# Altium PCB RF-IR-Blaster-v1.0.PcbDoc (part 1 of 2)
Units mm, origin at the board's own origin, x right, y up, seen from the top; angles counter-clockwise.
Board outline 65 x 61 mm, 2 copper layers (Top Layer, Bottom Layer), stack 1.58 mm thick; 64 components, 33 nets, 844 pads, 139 vias.
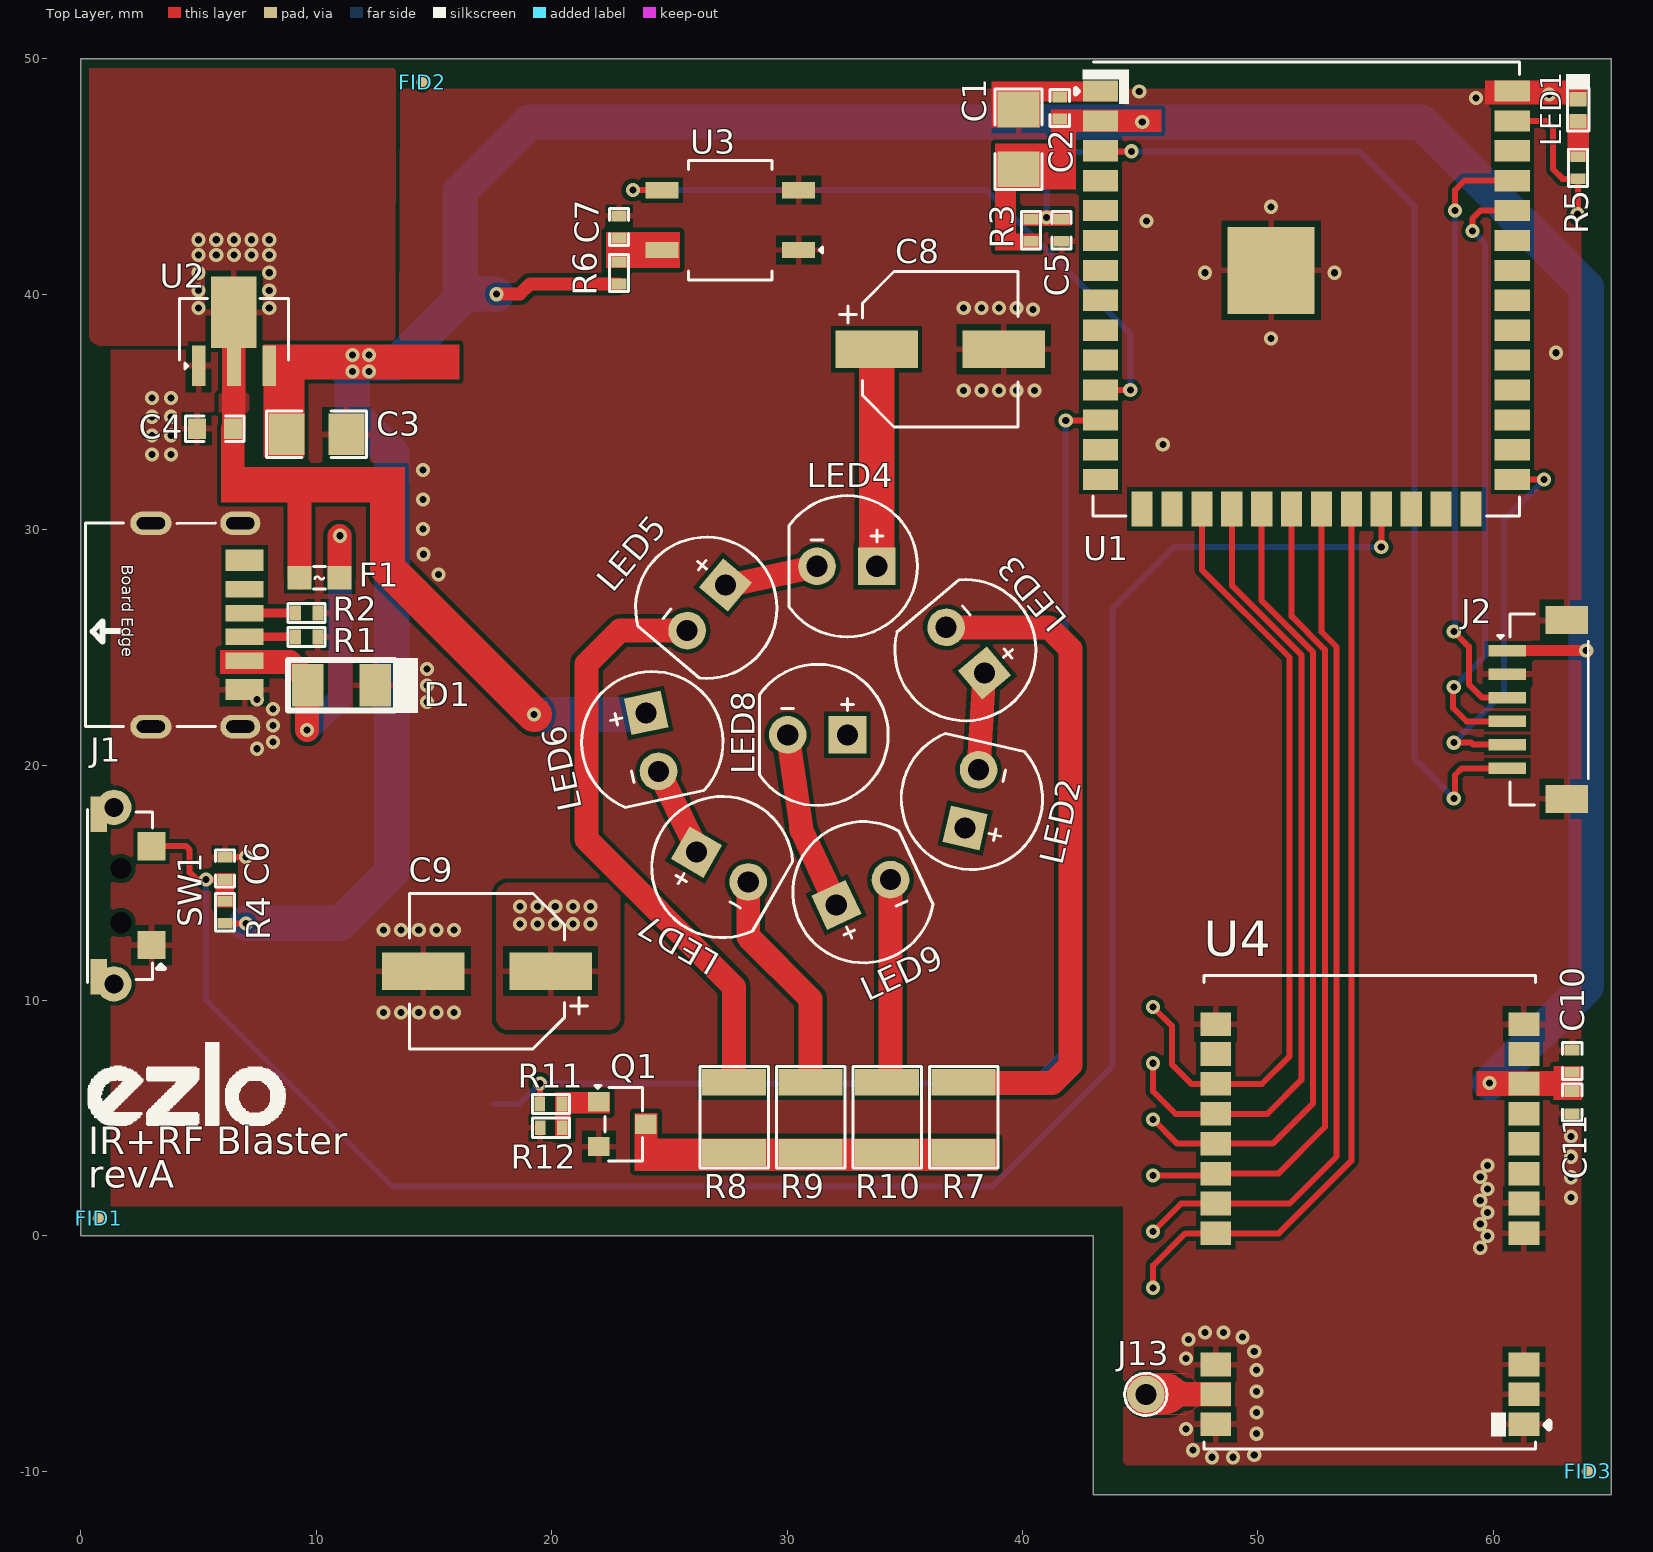
[diagram p0: Top Layer view]
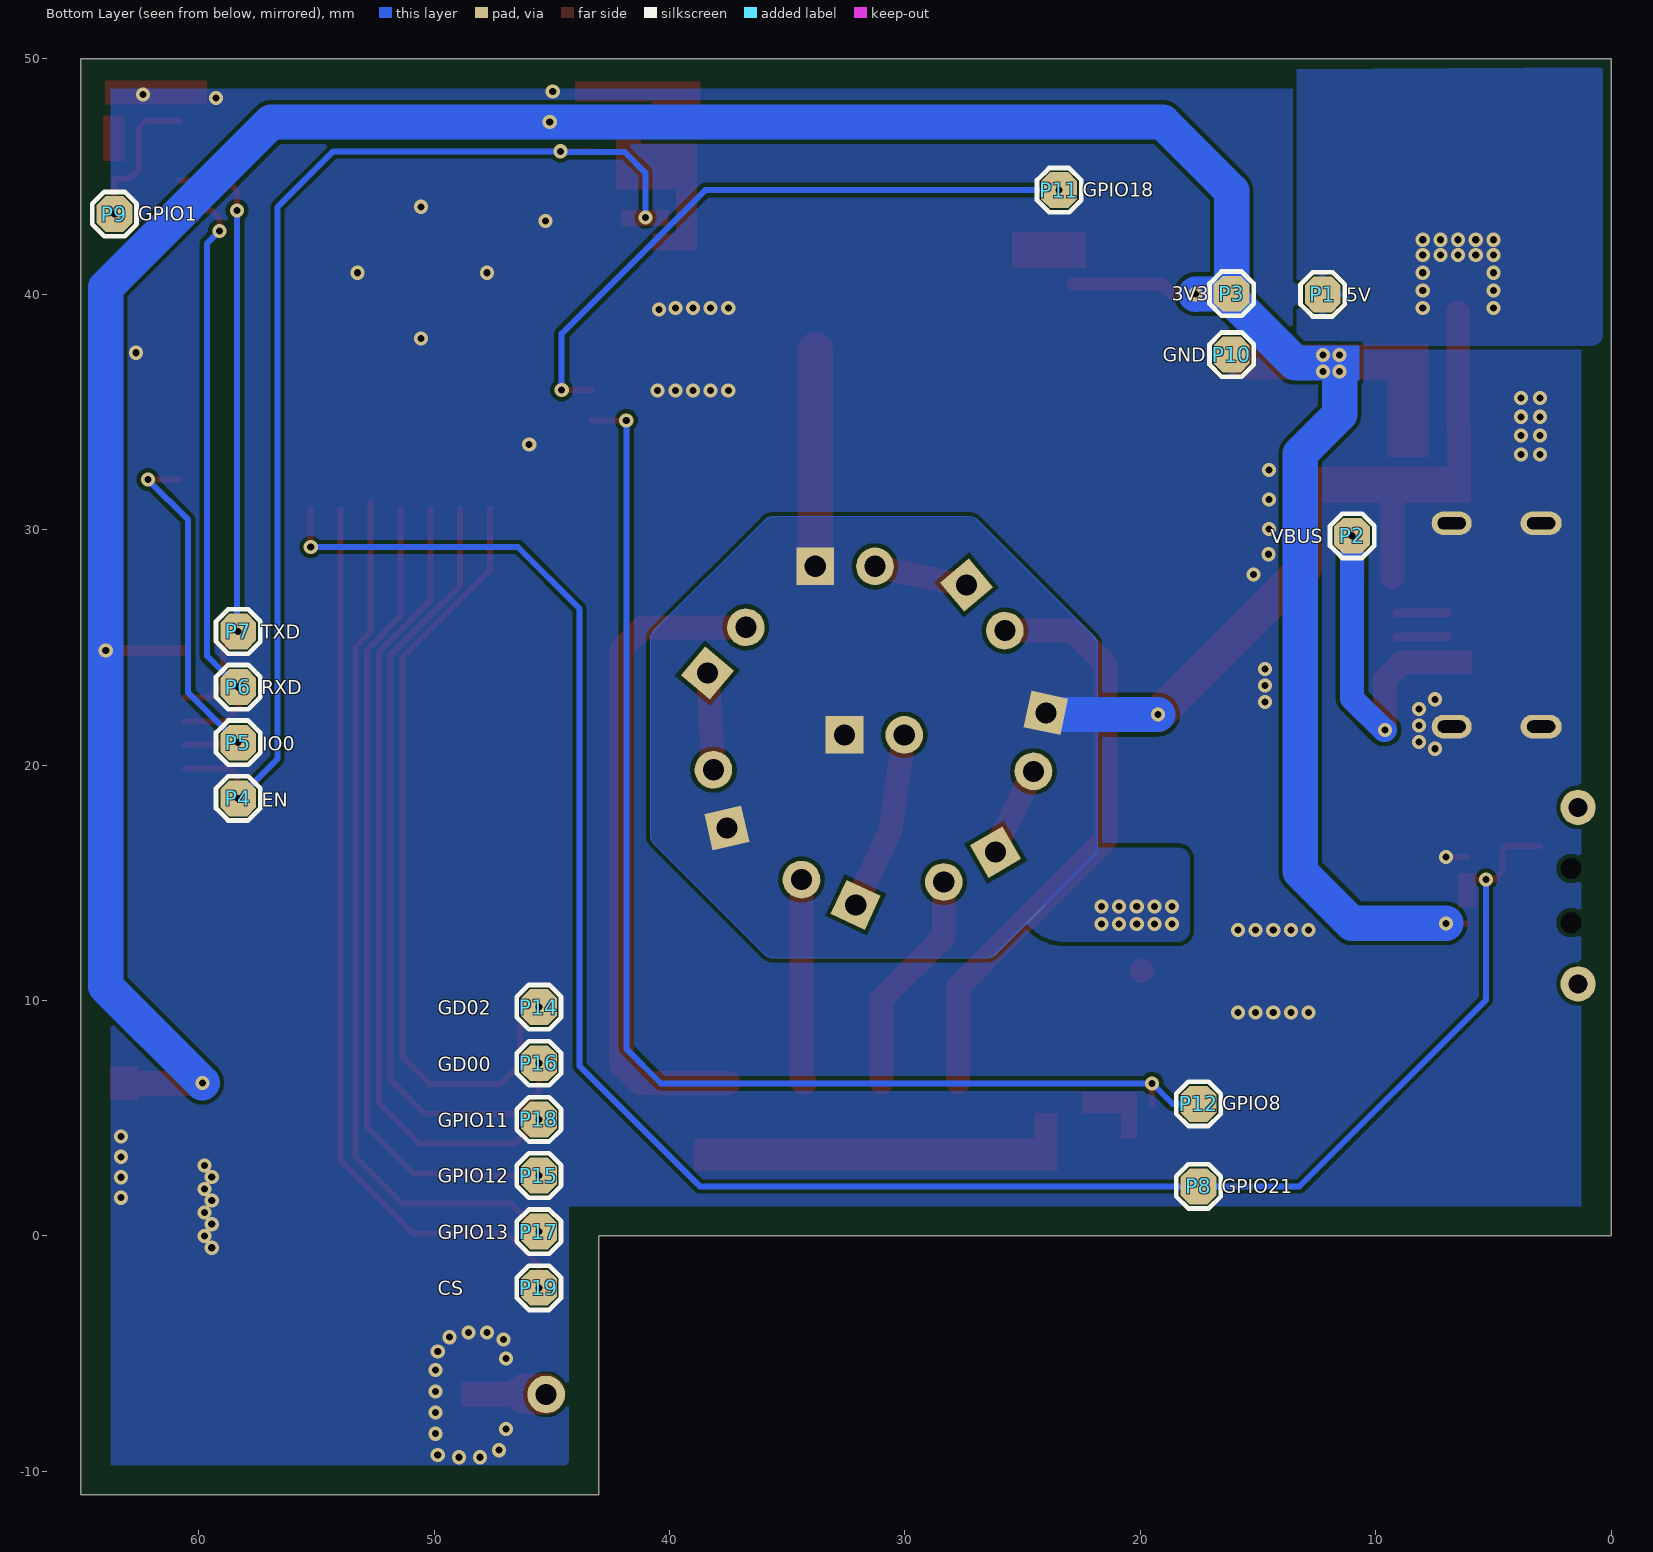
[diagram p1: Bottom Layer view, seen from below]

## Layer stack, top to bottom
Top Solder: solder mask 0.01, Solder Resist, Dk 3.3
Top Layer: signal copper 0.035
Dielectric 1: dielectric 1.51, FR-4, Dk 4.5
Bottom Layer: signal copper 0.035
Bottom Solder: solder mask 0.01, Solder Resist, Dk 3.3

## Board outline
0,0 0,50 65,50 65,-11 43,-11 43,0

## Design rules (kind name [scope] priority, off if disabled: settings)
Clearance [All] p1: gap=0.178 ignorepadtopadclearanceinfootprint=FALSE except(0: Arc-Hole Track-Hole SMDPad-Hole THPad-Hole Via-Hole Fill-Hole Poly-Hole Region-Hole Text-Hole; 0.102: Arc-SMDPad Track-SMDPad SMDPad-SMDPad)
HoleSize [All] p1: absolutevalues=TRUE maxlimit=25.4 minlimit=0.025 maxpercent=80.000 minpercent=20.000
HoleToHoleClearance [All] p1: gap=0 allowstackedmicrovias=TRUE
MinimumSolderMaskSliver [All] p1: minsoldermaskwidth=0
PolygonConnect [All] p1: thpad.connectstyle=Direct thpad.reliefconductorwidth=0.254 thpad.reliefentries=4 thpad.polygonreliefangle="90 Angle" thpad.airgapwidth=0.254 smdpad.connectstyle=Relief smdpad.reliefconductorwidth=0.254 smdpad.reliefentries=4 smdpad.polygonreliefangle="90 Angle" smdpad.airgapwidth=0.254 via.connectstyle=Direct via.reliefconductorwidth=0.254 via.reliefentries=4 via.polygonreliefangle="90 Angle" via.airgapwidth=0.254
RoutingVias [All] p1: holewidth=0.3 width=0.6 viastyle="Through Hole" minholewidth=0.3 minwidth=0.6 maxholewidth=0.3 maxwidth=0.6
SilkToSilkClearance [All] p1: silktosilkclearance=0
SilkToSolderMaskClearance [IsPad] p1: minsilkscreentomaskgap=0 clearancetoexposedcopper=TRUE
SolderMaskExpansion [All] p1: expansion=0.102 istentingtop=FALSE
Width [All] p1: maxlimit=1.5 minlimit=0.254 preferedwidth=0.559
25 further rules are at their usual default settings.

## Classes and differential pairs
component class U_USB-Power-Sheet: C3 C4 D1 F1 J1 P1 P2 P3 P10 R1 R2 U2
component class U_IR-Transmitter-Sheet: C8 C9 LED2 LED3 LED4 LED5 LED6 LED7 LED8 LED9 P12 Q1 R7 R8 R9 R10 R11 R12
component class U_IR-Reciever-Sheet: C7 P11 R6 U3
component class U_Controller-Sheet: C1 C2 C5 C6 J2 LED1 P4 P5 P6 P7 P8 P9 R3 R4 R5 SW1 U1
component class U_CC1101-Sheet: C10 C11 J13 P14 P15 P16 P17 P18 P19 U4

## Components (designator, comment, footprint, x,y, rotation, side; value= is the part's Value field where it differs from the comment)
C1 "22uF" Cap-1206 39.827,46.584 r270 top locked
C2 "100nF" Cap-0402 41.58,47.917 r270 top
C3 "22uF" Cap-1206 10.008,34.058 r180 top locked
C4 "10uF" CAP-0603 5.69,34.29 r0 top locked
C5 "1uF" Cap-0402 41.656,42.721 r90 top locked
C6 "100nF" Cap-0402 6.122,15.617 r270 top locked
C7 "4.7uF" Cap-0402 22.86,42.861 r270 top locked
C8 "220uF" RT1A221M0605 36.5,37.666 r0 top locked
C9 "220uF" RT1A221M0605 17.25,11.25 r180 top locked
C10 "1uF" Cap-0402 63.348,7.428 r270 top locked
C11 "100nF" Cap-0402 63.348,5.662 r90 top locked
D1 "SMF5.0CA" SOD-123FL 11.067,23.392 r180 top locked
F1 "BSMD0603L-100" fuse-0603 10.135,27.962 r180 top locked
FID1 "Fiducial" Fiducial_0.5mm_Mask1mm 0.75,0.75 r0 top
FID2 "Fiducial" Fiducial_0.5mm_Mask1mm 14.5,49 r0 top
FID3 "Fiducial" Fiducial_0.5mm_Mask1mm 64,-10 r0 top
J1 "TYPE-C-31-M-17" TYPE-C-31-M-17_ 4.962,25.957 r270 top locked
J2 "Voltlink Target" "Voltlink Target" 61.857,22.364 r270 top locked
J13 "Test Point TH 0.9mm" "TP 0.9mm" 45.237,-6.731 r0 top
LED1 "XZVG68W-2" LED-0402 63.602,47.819 r90 top locked
LED2 "IR333-A" IR333_A 37.846,18.566 r77 top locked
LED3 "IR333-A" IR333_A 37.57,24.883 r130 top locked
LED4 "IR333-A" IR333_A 32.538,28.446 r180 top locked
LED5 "IR333-A" IR333_A 26.565,26.686 r230 top locked
LED6 "IR333-A" IR333_A 24.273,20.976 r282 top locked
LED7 "IR333-A" IR333_A 27.247,15.67 r330 top locked
LED8 "IR333-A" IR333_A 31.293,21.285 r180 top
LED9 "IR333-A" IR333_A 33.241,14.602 r25 top locked
P1 "TEST POINT" Test-point 12.25,40 r180 bottom locked
P2 "TEST POINT" Test-point 10.998,29.743 r180 bottom locked
P3 "TEST POINT" Test-point 16.118,40.025 r180 bottom locked
P4 "TEST POINT" Test-point 58.319,18.591 r180 bottom locked
P5 "TEST POINT" Test-point 58.319,20.953 r180 bottom locked
P6 "TEST POINT" Test-point 58.319,23.315 r180 bottom locked
P7 "TEST POINT" Test-point 58.319,25.678 r180 bottom locked
P8 "TEST POINT" Test-point 17.526,2.108 r180 bottom
P9 "TEST POINT" Test-point 63.576,43.409 r270 bottom
P10 "TEST POINT" Test-point 16.118,37.44 r180 bottom locked
P11 "TEST POINT" Test-point 23.444,44.425 r180 bottom
P12 "TEST POINT" Test-point 17.526,5.613 r180 bottom
P14 "TEST POINT" Test-point 45.542,9.722 r90 bottom
P15 "TEST POINT" Test-point 45.542,2.568 r90 bottom
P16 "TEST POINT" Test-point 45.542,7.338 r90 bottom
P17 "TEST POINT" Test-point 45.542,0.184 r90 bottom
P18 "TEST POINT" Test-point 45.542,4.953 r90 bottom
P19 "TEST POINT" Test-point 45.542,-2.201 r90 bottom
Q1 "YJL2302B" SOT-23-3L_ 23,4.75 r270 top locked
R1 "5.1K" Res-0402 9.588,25.451 r180 top locked
R2 "5.1K" Res-0402 9.588,26.467 r180 top locked
R3 "10K" Res-0402 40.361,42.721 r270 top locked
R4 "10K" Res-0402 6.122,13.75 r270 top locked
R5 "1K" Res-0402 63.602,45.375 r270 top locked
R6 "100R" Res-0402 22.86,40.905 r270 top locked
R7 "14R" Res_1210 37.5,5.038 r270 top
R8 "14R" Res_1210 27.75,5.038 r270 top
R9 "14R" Res_1210 31,5.038 r270 top
R10 "14R" Res_1210 34.25,5.038 r270 top
R11 "100R" Res-0402 19.964,5.613 r180 top locked
R12 "10K" Res-0402 19.977,4.597 r0 top locked
SW1 "YTS-B003-2A" YTS-B003-2A 1.877,14.458 r90 top locked
U1 "ESP32-S3-WROOM-1U-N4" "41-SMD UFL Module" 52.057,39.757 r0 top locked
U2 "LR1107G-33-AB3-C-R" SOT-89-3 6.5,38.1 r0 top locked
U3 "IRM-H638T/TR2" SMD-4,4x5mm 27.585,43.153 r180 top locked
U4 "E07-400M10S" E07-400M10S 54.75,0.5 r180 top locked

## Footprints (in the part's own frame and the unit in brackets; to place one, negate y for a bottom-side part, rotate by r counter-clockwise, add the part's x,y. Pads: shape width x height; smd on the part's side, far side on the other; paste and mask are expansions set on the pad)
"41-SMD UFL Module" [mm]
  rect 1.5x0.9 smd: 1(-8.75,8.88) 2(-8.75,7.61) 3(-8.75,6.34) 4(-8.75,5.07) 5(-8.75,3.8) 6(-8.75,2.53) 7(-8.75,1.26) 8(-8.75,-0.01) 9(-8.75,-1.28) 10(-8.75,-2.55) 11(-8.75,-3.82) 12(-8.75,-5.09) 13(-8.75,-6.36) 14(-8.75,-7.63) 27(8.75,-7.63) 28(8.75,-6.36) 29(8.75,-5.09) 30(8.75,-3.82) 31(8.75,-2.55) 32(8.75,-1.28) 33(8.75,-0.01) 34(8.75,1.26) 35(8.75,2.53) 36(8.75,3.8) 37(8.75,5.07) 38(8.75,6.34) 39(8.75,7.61) 40(8.75,8.88)
  rect 0.9x1.5 smd: 15(-6.98,-8.88) 16(-5.71,-8.88) 17(-4.44,-8.88) 18(-3.17,-8.88) 19(-1.9,-8.88) 20(-0.63,-8.88) 21(0.64,-8.88) 22(1.91,-8.88) 23(3.18,-8.88) 24(4.45,-8.88) 25(5.72,-8.88) 26(6.99,-8.88)
  rect 3.7x3.7 smd: 41(-1.5,1.26)
  silkscreen extent -9.8,-9.17 9.05,10.11, body extent -9,-9.12 10.99,123, height 7.73
Cap-0402 [mil]
  rect 18x25 smd mask+2.36: 1(-18.5,0) 2(18.5,0)
  silkscreen extent -31,-16 31,16, body extent -20,-10 20,10, height 19
CAP-0603 [mil]
  rect 30x35 smd mask+2.36: 1(-30,0) 2(30,0)
  silkscreen extent -49,-21 49,21, body extent -32,-16 31,16, height 34
Cap-1206 [mil] "SMD 1206"
  rect 60x70 smd: 1(-50,0) 2(50,0)
  silkscreen extent -84,-39 84,39, body extent -63,-31 63,32, height 39
E07-400M10S [mm]
  rect 1.3x1 smd: 1(-6.55,8.5) 2(-6.55,7.23) 3(-6.55,5.96) 4(-6.55,0.39) 5(-6.55,-0.88) 6(-6.55,-2.15) 7(-6.55,-3.42) 8(-6.55,-4.69) 9(-6.55,-5.96) 10(-6.55,-7.23) 11(-6.55,-8.5) 12(6.55,-8.5) 13(6.55,-7.23) 14(6.55,-5.96) 15(6.55,-4.69) 16(6.55,-3.42) 17(6.55,-2.15) 18(6.55,-0.88) 19(6.55,0.39) 20(6.55,5.96) 21(6.55,7.23) 22(6.55,8.5)
  silkscreen extent -7.62,-10.57 7.04,9.55, body extent -7,-10.51 7,9.49, height 3.1
Fiducial_0.5mm_Mask1mm [mm]
  round 0.5 smd paste-0.5 mask+0.25: Un1(0,0)
fuse-0603 [mm]
  rect 1x1 smd: 1(-0.85,0) 2(0.85,0)
  silkscreen extent -0.25,-0.48 0.25,0.48, body extent -0.77,-0.42 0.78,0.43, height 0.45
IR333_A [mm]
  rect 1.6x1.6 hole 0.9: 1(-1.27,0)
  round 1.6 hole 0.9: 2(1.27,0)
  silkscreen extent -3,-3 2.47,3, body extent -2.95,-10.72 2.45,0.23, height 7.95
LED-0402 [mm]
  rect 0.62x0.72 smd: 1(-0.475,0) 2(0.475,0)
  silkscreen extent -0.89,-0.51 1.55,0.51, body extent -0.5,-0.25 0.51,0.25, height 0.45
Res-0402 [mil]
  rect 18x25 smd mask+2.17: 1(-18.5,0) 2(18.5,0)
  silkscreen extent -32,-17 32,16, body extent -23,-11 23,11, height 16
Res_1210 [mm]
  rect 1.14x2.72 smd: 1(-1.49,0) 2(1.49,0)
  silkscreen extent -2.16,-1.45 2.16,1.45, body extent -1.6,-1.25 1.6,1.25, height 0.7
RT1A221M0605 [mm]
  rect 3.5x1.6 smd: 1(-2.7,0) 2(2.7,0)
  silkscreen extent -4.27,-3.3 3.3,3.3, body extent -3.61,-3.33 3.59,3.27, height 5.4
SMD-4,4x5mm [mm]
  rect 1.4x0.7 smd: 1(-2.9,1.27) 2(-2.9,-1.27) 3(2.9,-1.27) 4(2.9,1.27)
  silkscreen extent -3.91,-2.54 1.78,2.54, body extent -3.5,-2.5 3.5,2.5, height 3.99
SOD-123FL [mm]
  rect 1.34x1.8 smd: 1(-1.43,0) 2(1.43,0)
  silkscreen extent -3.25,-1.17 2.26,1.17, body extent -1.8,-0.82 1.8,0.82, height 0.95
SOT-23-3L_ [mm]
  rect 0.82x0.92 smd: 1(-0.95,-1) 2(0.95,-1) 3(0,1)
  silkscreen extent -1.65,-1.17 1.56,0.86, body extent -1.5,-1.25 1.5,1.25, height 1.1
SOT-89-3 [mm]
  rect 0.58x1.73 smd: 1(-1.5,-1.132) 2(0,-1.132) 3(1.5,-1.132)
  rect 1.933x3.03 smd: 2(0,1.132)
  silkscreen extent -2.31,-1.27 2.31,1.73, body extent -2.25,-1.84 2.25,2.41, height 1.54
Test-point [mil]
  oct 60x60 smd: 1(0,0)
  silkscreen extent -37,-37 37,37
"TP 0.9mm" [mm]
  round 1.6 hole 0.9: 1(0,0)
  silkscreen extent -0.9,-0.9 0.9,0.9
TYPE-C-31-M-17_ [mm]
  rect 0.7x1.6 smd: A5(-0.5,1.99) A9(1.52,1.99) B5(0.5,1.99) B9(-1.52,1.99)
  rect 0.9x1.6 smd: A12(2.75,1.99) B12(-2.75,1.99)
  oval 1x1.7 hole 0.52 slot 1.2 at 90 deg: MH1(4.32,1.81) MH4(-4.32,1.81)
  oval 1x1.75 hole 0.52 slot 1.2 at 90 deg: MH2(4.32,-1.99) MH3(-4.32,-1.99)
  silkscreen extent -4.32,-4.78 4.32,0.75, body extent -4.47,-4.72 4.47,2.08, height 3.38
"Voltlink Target" [mm]
  rect 0.5x1.6 smd: 1(-2.5,-1.262) 2(-1.5,-1.262) 3(-0.5,-1.262) 4(0.5,-1.262) 5(1.5,-1.262) 6(2.5,-1.262)
  rect 1.2x1.8 smd: MP1(-3.8,1.262) MP2(3.8,1.262)
  silkscreen extent -4.06,-1.68 4.06,2.17, body extent -4,-1.49 4,2.11, height 4.25
YTS-B003-2A [mm]
  rect 1.2x1.2 smd: 1(-2.1,-1.125) 2(2.1,-1.125)
  rect 1.5x0.7 smd: 3(3.45,1.125) 4(-3.45,1.125)
  round 1.5 hole 0.8: 5(3.75,0.475) 6(-3.75,0.475)
  round 0 hole 0.9 unplated: MH0(-1.15,0.175) MH1(1.15,0.175)
  silkscreen extent -3.68,-1.68 3.66,1.6, body extent -3.7,-1.37 3.7,2.36, height 3.59

## Part data
C1 C3: library part C3216X5R1E226M160AB, "CAP CER 22UF 25V X5R 1206", Case Code (Imperial)=1206, Case Code (Metric)=3216, Dielectric=X5R, Dielectric Material=Ceramic, LCSC Part Number=C2167811, Manufacturer=TDK, Max Operating Temperature=85°C, Min Operating Temperature=-55°C, Package Quantity=1, Supplier Part Number 1=445-6000-1-ND, Tolerance=20%, Voltage Rating=25V, Capacitance=22uF, Case/Package=1206, ComponentLink1Description=https://product.tdk.com/info/en/documents/chara_sheet/C3216X5R1E226M160AB.pdf?src-supplier=Digi-Key, ComponentLink1URL=https://product.tdk.com/info/en/documents/chara_sheet/C3216X5R1E226M160AB.pdf?src-supplier=Digi-Key, ComponentLink2Description=http://www.mouser.com/ds/2/400/lcc_commercial_general_en-837201.pdf?src-supplier=Mouser, ComponentLink2URL=http://www.mouser.com/ds/2/400/lcc_commercial_general_en-837201.pdf?src-supplier=Mouser, Construction=Flat, Depth=1.6mm, Height=1.6mm, Item Type=Capacitor, Lead Free="Lead Free", Length=3.2mm, Manufacturer Part Number=C3216X5R1E226M160AB, Mount="Surface Mount", Packaging="Tape and Reel", Pricing 1="1=1.08, 10=0.822, 50=0.6832, 100=0.5882, 500=0.4554, 1000=0.39215 (USD)", REACH SVHC="No SVHC", Resistor Type=Ceramic, RoHS Compliant=Yes, Series=C, Stock 1=21442, Supplier 1=Digi-Key, Termination=SMD/SMT, Thickness=0.071inch, Voltage Rating (DC)=25V, Weight=0.000571oz, Width=0.063inch
C2 C6 C11: library part CC0402KRX5R7BB104, "CAP CER 0.1UF 16V X5R 0402", Case Code (Imperial)=0402, Case Code (Metric)=1005, Dielectric=X5R, LCSC Part Number=C106204, Manufacturer=Yageo, Max Operating Temperature=85°C, Min Operating Temperature=-55°C, Package Quantity=1, Resistor Type=Ceramic, Supplier Part Number 1=603-CC402KRX5R7BB104, Tolerance=10%, Voltage Rating=16V, Capacitance=100nF, Case/Package=0402, Category="Ceramic Capacitors", ComponentLink1Description=https://datasheet.ciiva.com/155/mlccorderingcode-155879.pdf?src-supplier=Digi-Key, ComponentLink1URL=https://datasheet.ciiva.com/155/mlccorderingcode-155879.pdf?src-supplier=Digi-Key, ComponentLink2Description=https://datasheet.ciiva.com/155/mlccorderingcode-155878.pdf?src-supplier=Digi-Key, ComponentLink2URL=https://datasheet.ciiva.com/155/mlccorderingcode-155878.pdf?src-supplier=Digi-Key, ComponentLink3Description=https://datasheet.ciiva.com/155/mlccorderingcode-155880.pdf?src-supplier=Digi-Key, ComponentLink3URL=https://datasheet.ciiva.com/155/mlccorderingcode-155880.pdf?src-supplier=Digi-Key, ComponentLink4Description=https://datasheet.ciiva.com/11464/upy-gphc-x5r-4v-to-50v-12-11464869.pdf?src-supplier=Avnet, ComponentLink4URL=https://datasheet.ciiva.com/11464/upy-gphc-x5r-4v-to-50v-12-11464869.pdf?src-supplier=Avnet, Construction=Flat, Depth=0.5mm, Halogen Free="Halogen Free", Height=0.5mm, Lead Free="Lead Free", Length=1mm, Manufacturer Part Number=CC0402KRX5R7BB104, Mount="Surface Mount", Number of Pins=2, Packaging="Tape and Reel", Pricing 1="1=0.10000, 10=0.02300, 50=0.02300, 100=0.01100, 1000=0.00600, 10000=0.00400 (USD)", Radiation Hardening=No, REACH SVHC=Unknown, RoHS=Yes, RoHS Compliant=Yes, Series=CC, Stock 1=936792, Supplier 1=Mouser, Termination=SMD/SMT, Thickness=0.022inch, Voltage Rating (DC)=16V, Width=0.02inch
C4: library part TMK107BBJ106MA-T, "CAP CER 10UF 25V X5R 0603", Case Code (Imperial)=0603, Case Code (Metric)=1608, LCSC Part Number=C386081, Manufacturer="Taiyo Yuden", Max Operating Temperature=85°C, Min Operating Temperature=-55°C, Supplier Part Number 1=587-6023-1-ND, Tolerance=20%, Voltage Rating=25V, Capacitance=10uF, Case/Package=0603, ComponentLink1Description=http://ds.yuden.co.jp/TYCOMPAS/ut/detail.do?productNo=TMK107BBJ106MA-T&fileName=TMK107BBJ106MA-T_SS&mode=specSheetDownload&src-supplier=Digi-Key, ComponentLink1URL=http://ds.yuden.co.jp/TYCOMPAS/ut/detail.do?productNo=TMK107BBJ106MA-T&fileName=TMK107BBJ106MA-T_SS&mode=specSheetDownload&src-supplier=Digi-Key, Lead Free="Lead Free", Manufacturer Part Number=TMK107BBJ106MA-T, Mount="Surface Mount", Packaging="Tape and Reel", Pricing 1="1=0.46, 10=0.32, 50=0.2238, 100=0.1918, 500=0.14386, 1000=0.12149 (USD)", RoHS Compliant=Yes, Stock 1=85333, Supplier 1=Digi-Key
C5 C10: library part UMK105CBJ105MV-F, "CAP CER 1UF 50V X5R 0402", LCSC Part Number=C2880413, Manufacturer="Taiyo Yuden", Supplier Part Number 1=587-6278-1-ND, ComponentLink1Description=http://www.farnell.com/datasheets/2801300.pdf?src-supplier=Newark, ComponentLink1URL=http://www.farnell.com/datasheets/2801300.pdf?src-supplier=Newark, ComponentLink2Description=http://www.farnell.com/datasheets/2801300.pdf?src-supplier=Farnell, ComponentLink2URL=http://www.farnell.com/datasheets/2801300.pdf?src-supplier=Farnell, ComponentLink3Description="https://ds.yuden.co.jp/TYCOMPAS/ut/detail?pn=UMK105CBJ105MV-F &amp;u=M&src-supplier=Digi-Key", ComponentLink3URL="https://ds.yuden.co.jp/TYCOMPAS/ut/detail?pn=UMK105CBJ105MV-F &amp;u=M&src-supplier=Digi-Key", Item Type=Capacitor, Lead Free="Lead Free", Manufacturer Part Number=UMK105CBJ105MV-F, Pricing 1="1=0.27, 10=0.184, 50=0.1224, 100=0.104, 500=0.07342, 1000=0.06424, 2500=0.06118, 5000=0.05659 (USD)", RoHS Compliant=Yes, Stock 1=412061, Supplier 1=Digi-Key
C7: library part CC0402KRX5R6BB475, "CAP CER 4.7UF 10V X5R 0402", Case Code (Imperial)=0402, Case Code (Metric)=1005, LCSC Part Number=C326586, Manufacturer=Yageo, Max Operating Temperature=85°C, Min Operating Temperature=-55°C, Supplier Part Number 1=3871698, Tolerance=10%, Voltage Rating=10V, Capacitance=4.7uF, Case/Package=0402, Category="Ceramic Capacitors", ComponentLink1Description=http://www.yageo.com/documents/recent/UPY-GPHC_X5R_4V-to-50V_25.pdf?src-supplier=Digi-Key, ComponentLink1URL=http://www.yageo.com/documents/recent/UPY-GPHC_X5R_4V-to-50V_25.pdf?src-supplier=Digi-Key, Manufacturer Part Number=CC0402KRX5R6BB475, Mount="Surface Mount", Packaging="Cut Tape", Pricing 1="10000=0.02310, 50000=0.02100 (GBP)", RoHS=Yes, RoHS Compliant=Yes, Stock 1=20000, Supplier 1=Farnell
C8 C9: library part RT1A221M0605, "220uF 5.4mm 10V 6.3mm ±20% SMD,D6.3xL5.4mm Aluminum Electrolytic Capacitors - SMD ROHS", LCSC Part Number=C267466, Manufacturer=ROQANG, Package=SMD,D6.3xL5.4mm, ComponentLink1Description=LCSC, ComponentLink1URL=https://lcsc.com/product-detail/Aluminum-Electrolytic-Capacitors-SMD_ROQANG-RT1A221M0605_C267466.html, Item Type=Capacitor, Manufacturer Part Number=RT1A221M0605
D1: "9.2V 6.4V 5V SOD-123FL TVS ROHS", LCSC Part Number=C2980402, Manufacturer=GOODWORK, Package=SOD-123FL, ComponentLink1Description=LCSC, ComponentLink1URL=https://www.lcsc.com/product-detail/TVS_GOODWORK-SMF5-0CA_C2980402.html, Item Type="TVS Diode", Manufacturer Part Number=SMF5.0CA
F1: "6V 1A 50A 1W -40℃~+85℃ 2A 9mΩ 0.5s 80mΩ 0603 Resettable Fuses ROHS", LCSC Part Number=C2757929, Manufacturer=BHFUSE, Package=0603, ComponentLink1Description=LCSC, ComponentLink1URL=https://lcsc.com/product-detail/Resettable-Fuses_BHFUSE-BSMD0603L-100_C2757929.html, Item Type=Fuse, Manufacturer Part Number=BSMD0603L-100
FID1 FID2 FID3: library part Fiducial_0.5mm_Mask1mm, "Circular Fiducial, 0.5mm bare copper, 1mm soldermask opening (Level C)", Sheetfile=irblaster.kicad_sch, ki_description="Fiducial Marker", ki_keywords="fiducial marker"
J1: "Receptacle USB - Type C 6 - USB Connectors ROHS", Manufacturer="Koren Hroparts Elec", Manufacturer Part Number=Type-C-31-M-17, ComponentLink1Description=LCSC, ComponentLink1URL=https://www.lcsc.com/product-detail/USB-Connectors_Korean-Hroparts-Elec-TYPE-C-31-M-17_C283540.html
J2: library part C145963, "1x6P SH 1 1mm 6 SMD,P=1mm Wire To Board / Wire To Wire Connector ROHS", Manufacturer=BOOMELE, Package=SMD,P=1mm, ComponentLink1Description=LCSC, ComponentLink1URL=https://www.lcsc.com/product-detail/Wire-To-Board-Wire-To-Wire-Connector_BOOMELE-Boom-Precision-Elec-C145963_C145963.html, Item Type=Connector, LCSC Part Number=C145963, Manufacturer Part Number=C145963
J13: "------", Item Type="Test Point", Manufacturer Part Number="Test Point TH 0.9mm"
LED1: "LED GREEN CLEAR CHIP SMD", Case Code (Imperial)=0402, Case Code (Metric)=1005, Color=Green, Forward Voltage=2.1V, Lens Color=Colorless, Manufacturer=SunLED, Supplier Part Number 1=1497-1219-6-ND, Test Current=20mA, Case/Package=0402, ComponentLink1Description=http://www.sunledusa.com/products/spec/XZVG68W-2.pdf?src-supplier=Digi-Key, ComponentLink1URL=http://www.sunledusa.com/products/spec/XZVG68W-2.pdf?src-supplier=Digi-Key, ComponentLink2Description=https://www.sunledusa.com/products/spec/XZVG68W-2.pdf?src-supplier=Digi-Key, ComponentLink2URL=https://www.sunledusa.com/products/spec/XZVG68W-2.pdf?src-supplier=Digi-Key, Dominant Wavelength=570nm, Height=0.6mm, Item Type=LED, Length=1mm, Lens Transparency=Clear, Luminous Intensity=49mcd, Manufacturer Part Number=XZVG68W-2, Mount="Surface Mount", Packaging="Tape and Reel", Pricing 1="1=0.5, 10=0.36, 100=0.16, 500=0.112, 1000=0.092 (USD)", Stock 1=4185, Supplier 1=Digi-Key, Viewing Angle=120°, Width=0.5mm
LED2 LED3 LED4 LED5 LED6 LED7 LED8 LED9: "EMITTER IR 940NM 100MA RADIAL", Case/Package=Radial, Forward Current=50mA, Forward Voltage=1.2V, LCSC Part Number=C95407, Manufacturer=Everlight, Max Operating Temperature=85°C, Max Power Dissipation=100mW, Min Operating Temperature=-40°C, Package Quantity=500, Reverse Voltage=5V, Supplier Part Number 1=1080-1080-ND, Test Current=20mA, Category=LEDs, ComponentLink1Description=https://datasheet.ciiva.com/2107/201407061516067600-2107736.pdf?src-supplier=Digi-Key, ComponentLink1URL=https://datasheet.ciiva.com/2107/201407061516067600-2107736.pdf?src-supplier=Digi-Key, ComponentLink2Description=https://datasheet.ciiva.com/48438/ir333-a-eng-tds-48438869.pdf?src-supplier=Distrelec, ComponentLink2URL=https://datasheet.ciiva.com/48438/ir333-a-eng-tds-48438869.pdf?src-supplier=Distrelec, Depth=5.9mm, Item Type="Infrared LED", Lead Free="Lead Free", Length=5.9mm, Lens Style=Diffused,Colored,Circular, Manufacturer Part Number=IR333-A, Mount="Through Hole", Number of Elements=1, Number of LEDs=1, Number of Pins=2, Orientation="Top View", Packaging=Bulk, Power Dissipation=100mW, Pricing 1="1=0.54000, 10=0.33000, 100=0.18950, 1000=0.14832, 2000=0.13596, 5000=0.12360, 10000=0.11536, 25000=0.11124 (USD)", RoHS=Yes, RoHS Compliant=Yes, Series=-, Stock 1=73854, Supplier 1=Digi-Key, Viewing Angle=20°, Wavelength=940nm
P1 P2 P3 P4 P5 P6 P7 P8 P9 P10 P11 P12 P14 P15 P16 P17 P18 P19: "Test Point ON", Item Type="TEST POINT"
Q1: "20V 3A 40mΩ@4.5V,3A 700mW 780mV@250uA 29pF@10V N Channel 280pF@10V 2.9nC@4.5V -55℃~+150℃@(Tj) SOT-23-3L MOSFETs ROHS", LCSC Part Number=C699316, Manufacturer="Yangzhou Yangjie Elec Tech", Package=SOT-23-3L, ComponentLink1Description=LCSC, ComponentLink1URL=https://lcsc.com/product-detail/MOSFETs_Yangzhou-Yangjie-Elec-Tech-YJL2302B_C699316.html, Item Type=Mosfet, Manufacturer Part Number=YJL2302B
R1 R2: library part RC0402FR-075K1L, "RES 5.1K OHM 1% 1/16W 0402", Case Code (Imperial)=0402, Case Code (Metric)=1005, LCSC Part Number=C105872, Manufacturer=Yageo, Max Operating Temperature=155°C, Max Power Dissipation=63mW, Min Operating Temperature=-55°C, Package Quantity=1, Resistance=5.1kR, Resistance Tolerance=1%, Resistor Type="Thick Film", Temperature Coefficient=100ppm/°C, Voltage Rating=50V, Case/Package=0402, Category="Chip SMD Resistors", ComponentLink1Description=https://datasheet.ciiva.com/7983/1018594-7983519.pdf?src-supplier=Element14, ComponentLink1URL=https://datasheet.ciiva.com/7983/1018594-7983519.pdf?src-supplier=Element14, ComponentLink2Description=https://datasheet.ciiva.com/46394/1018594-46394936.pdf?src-supplier=Element14, ComponentLink2URL=https://datasheet.ciiva.com/46394/1018594-46394936.pdf?src-supplier=Element14, ComponentLink3Description=https://datasheet.ciiva.com/2453/pyu-r-int-thick-7-2453401.pdf?src-supplier=Digi-Key, ComponentLink3URL=https://datasheet.ciiva.com/2453/pyu-r-int-thick-7-2453401.pdf?src-supplier=Digi-Key, ComponentLink4Description=https://datasheet.ciiva.com/2453/pyu-r-int-thick-7-2453402.pdf?src-supplier=Digi-Key, ComponentLink4URL=https://datasheet.ciiva.com/2453/pyu-r-int-thick-7-2453402.pdf?src-supplier=Digi-Key, ComponentLink5Description=https://datasheet.ciiva.com/2453/pyu-r-int-thick-7-2453400.pdf?src-supplier=Digi-Key, ComponentLink5URL=https://datasheet.ciiva.com/2453/pyu-r-int-thick-7-2453400.pdf?src-supplier=Digi-Key, ComponentLink6Description=https://datasheet.ciiva.com/12558/pyu-rc0402-51-rohs-l-6-r-8721-12558460.pdf?src-supplier=Mouser, ComponentLink6URL=https://datasheet.ciiva.com/12558/pyu-rc0402-51-rohs-l-6-r-8721-12558460.pdf?src-supplier=Mouser, ComponentLink7Description=https://datasheet.ciiva.com/16744/pyu-rc0402-51-rohs-l-6-r-16744283.pdf?src-supplier=Future+Electronics, ComponentLink7URL=https://datasheet.ciiva.com/16744/pyu-rc0402-51-rohs-l-6-r-16744283.pdf?src-supplier=Future+Electronics, ComponentLink8Description=https://datasheet.ciiva.com/15189/getdatasheetpartid-323636-15189493.pdf?src-supplier=Verical, ComponentLink8URL=https://datasheet.ciiva.com/15189/getdatasheetpartid-323636-15189493.pdf?src-supplier=Verical, Construction=Rectangular, Depth=0.5mm, Features="Moisture Resistant", Height=0.016inch, Item Type=Resistor, Lead Free="Lead Free", Length=1mm, Manufacturer Part Number=RC0402FR-075K1L, Military Standard=Not, Number of Terminations=2, Packaging="Tape and Reel", Power Rating=63mW, Pricing 1="10000=0.00085 (USD)", RoHS=Yes, RoHS Compliant=Yes, Series=RC, Stock 1=65000, Supplier 1=Avnet, Supplier Part Number 1=RC0402FR-075K1L, Technology="THICK FILM", Termination=SMD/SMT, Tolerance=1%, Voltage Rating (DC)=50V, Width=0.02inch, Working Voltage=50V
R3 R4 R12: library part SR0402FR-7T10KL, "RES 10K OHM 1% 1/5W 0402", LCSC Part Number=C854480, Manufacturer=Yageo, Supplier Part Number 1=YAG5815CT-ND, ComponentLink1Description=http://www.yageo.com/documents/recent/PYu-SR_D_F%20tol_RoHS_L_3.pdf?src-supplier=Digi-Key, ComponentLink1URL=http://www.yageo.com/documents/recent/PYu-SR_D_F%20tol_RoHS_L_3.pdf?src-supplier=Digi-Key, Manufacturer Part Number=SR0402FR-7T10KL, Pricing 1="1=0.56, 10=0.398, 100=0.2072, 1000=0.11156, 2500=0.10757, 5000=0.10598 (USD)", RoHS Compliant=Yes, Stock 1=7859, Supplier 1=Digi-Key
R5: library part RC0402FR-071KL, "RES 1K OHM 1% 1/16W 0402", Case Code (Imperial)=0402, Case Code (Metric)=1005, LCSC Part Number=C106235, Manufacturer=Yageo, Max Operating Temperature=155°C, Max Power Dissipation=63mW, Min Operating Temperature=-55°C, Power Rating=62.5mW, Resistance=1kR, Resistance Tolerance=1%, Resistor Type="Thick Film", Temperature Coefficient=100ppm/°C, Voltage Rating=50V, Case/Package=0402, Category="Chip SMD Resistors", ComponentLink1Description=https://datasheet.ciiva.com/11819/0900766b80c66297-11819477.pdf?src-supplier=RSComponents, ComponentLink1URL=https://datasheet.ciiva.com/11819/0900766b80c66297-11819477.pdf?src-supplier=RSComponents, ComponentLink2Description=https://datasheet.ciiva.com/7983/1018594-7983502.pdf?src-supplier=Element14, ComponentLink2URL=https://datasheet.ciiva.com/7983/1018594-7983502.pdf?src-supplier=Element14, ComponentLink3Description=https://datasheet.ciiva.com/22747/1018594-22747513.pdf?src-supplier=Element14, ComponentLink3URL=https://datasheet.ciiva.com/22747/1018594-22747513.pdf?src-supplier=Element14, ComponentLink4Description=https://datasheet.ciiva.com/12666/pyu-rc0402-51-rohs-l-6-r-12666741.pdf?src-supplier=Mouser, ComponentLink4URL=https://datasheet.ciiva.com/12666/pyu-rc0402-51-rohs-l-6-r-12666741.pdf?src-supplier=Mouser, ComponentLink5Description=https://datasheet.ciiva.com/7849/1018594-7849869.pdf?src-supplier=Element14, ComponentLink5URL=https://datasheet.ciiva.com/7849/1018594-7849869.pdf?src-supplier=Element14, ComponentLink6Description=https://datasheet.ciiva.com/7849/1018594-7849871.pdf?src-supplier=Element14, ComponentLink6URL=https://datasheet.ciiva.com/7849/1018594-7849871.pdf?src-supplier=Element14, ComponentLink7Description=https://datasheet.ciiva.com/17063/pyu-rc0402-51-rohs-l-6-r-17063193.pdf?src-supplier=Future+Electronics, ComponentLink7URL=https://datasheet.ciiva.com/17063/pyu-rc0402-51-rohs-l-6-r-17063193.pdf?src-supplier=Future+Electronics, Construction=Rectangular, Depth=0.5mm, Features="Moisture Resistant", Height=0.32mm, Item Type=Resistor, Lead Free="Lead Free", Length=1mm, Manufacturer Part Number=RC0402FR-071KL, Military Standard=Not, Number of Pins=2, Number of Terminations=2, Packaging="Tape and Reel", Pricing 1="10000=0.00085, 20000=0.00087, 40000=0.00084, 60000=0.00083, 80000=0.00079, 100000=0.00078, 1000000=0.00076 (USD)", Reach SVHC Compliant=Yes, RoHS=Yes, RoHS Compliant=Yes, Series=RC, Size Code=0402, Stock 1=13030000, Supplier 1=Avnet, Supplier Part Number 1=RC0402FR-071KL, Technology="THICK FILM", Termination=SMD/SMT, Tolerance=1%, Voltage Rating (DC)=50V, Width=0.5mm
R6 R11: library part RC0402FR-07100RL, "RES 100 OHM 1% 1/16W 0402", Case Code (Imperial)=0402, Case Code (Metric)=1005, LCSC Part Number=C106232, Manufacturer=Yageo, Max Operating Temperature=155°C, Max Power Dissipation=63mW, Min Operating Temperature=-55°C, Power Rating=62.5mW, Resistance Tolerance=1%, Resistor Type="Thick Film", Supplier Part Number 1=603-RC0402FR-07100RL, Temperature Coefficient=100ppm/°C, Voltage Rating=50V, Case/Package=0402, Category="Chip SMD Resistors", ComponentLink1Description=https://datasheet.ciiva.com/11808/0900766b80c66297-11808765.pdf?src-supplier=RSComponents, ComponentLink1URL=https://datasheet.ciiva.com/11808/0900766b80c66297-11808765.pdf?src-supplier=RSComponents, ComponentLink2Description=https://datasheet.ciiva.com/7849/1784430-7849810.pdf?src-supplier=Element14, ComponentLink2URL=https://datasheet.ciiva.com/7849/1784430-7849810.pdf?src-supplier=Element14, ComponentLink3Description=https://datasheet.ciiva.com/28367/1018594-28367226.pdf?src-supplier=Element14, ComponentLink3URL=https://datasheet.ciiva.com/28367/1018594-28367226.pdf?src-supplier=Element14, ComponentLink4Description=https://datasheet.ciiva.com/22747/1018594-22747511.pdf?src-supplier=Element14, ComponentLink4URL=https://datasheet.ciiva.com/22747/1018594-22747511.pdf?src-supplier=Element14, ComponentLink5Description=https://datasheet.ciiva.com/12667/pyu-rc0402-51-rohs-l-6-r-12667957.pdf?src-supplier=Mouser, ComponentLink5URL=https://datasheet.ciiva.com/12667/pyu-rc0402-51-rohs-l-6-r-12667957.pdf?src-supplier=Mouser, ComponentLink6Description=https://datasheet.ciiva.com/15189/getdatasheetpartid-329466-15189335.pdf?src-supplier=Verical, ComponentLink6URL=https://datasheet.ciiva.com/15189/getdatasheetpartid-329466-15189335.pdf?src-supplier=Verical, ComponentLink7Description=https://datasheet.ciiva.com/16740/pyu-rc0402-51-rohs-l-6-r-16740566.pdf?src-supplier=Future+Electronics, ComponentLink7URL=https://datasheet.ciiva.com/16740/pyu-rc0402-51-rohs-l-6-r-16740566.pdf?src-supplier=Future+Electronics, Construction=Rectangular, Depth=0.5mm, Features="Moisture Resistant", Height=0.32mm, Item Type=Resistor, Lead Free="Lead Free", Length=1mm, Manufacturer Part Number=RC0402FR-07100RL, Military Standard=Not, Number of Pins=2, Number of Terminations=2, Packaging="Tape and Reel", Pricing 1="1=0.10000, 10=0.01200, 50=0.01200, 100=0.00500, 1000=0.00300, 2500=0.00200, 10000=0.00100 (USD)", REACH SVHC="No SVHC", Resistance=100R, RoHS=Yes, RoHS Compliant=Yes, Series=RC, Size Code=0402, Stock 1=699545, Supplier 1=Mouser, Technology="THICK FILM", Termination=SMD/SMT, Tolerance=1%, Voltage Rating (DC)=50V, Width=0.5mm
R7 R8 R9 R10: library part RTT1214R0FTP, "500mW Thick Film Resistors ±100ppm/℃ ±1% 14Ω 1210 Chip Resistor - Surface Mount ROHS", LCSC Part Number=C333127, Manufacturer=RALEC, Package=1210, ComponentLink1Description=LCSC, ComponentLink1URL=https://www.lcsc.com/product-detail/Chip-Resistor-Surface-Mount_RALEC-RTT1214R0FTP_C333127.html, Item Type=Resistor, Manufacturer Part Number=RTT1214R0FTP
SW1: "3.5mm 3.5mm SMDSplicing Black Rectangle button 50mA Surface Mount 7mm SPST 100MΩ 20000 12V 250gf@±50gf SMD Tactile Switches ROHS", LCSC Part Number=C2910695, Manufacturer=YIYUAN, Package=Custom, ComponentLink1Description=LCSC, ComponentLink1URL=https://lcsc.com/product-detail/Tactile-Switches_YIYUAN-YTS-B003-2A_C2910695.html, Item Type="Tactile Switch", Manufacturer Part Number=YTS-B003-2A
U1: "RF TXRX MOD WIFI SURFACE MOUNT", LCSC Part Number=C2980296, Manufacturer="Espressif Systems", Supplier Part Number 1=1965-ESP32-S3-WROOM-1U-N4CT-ND, Category=Uncategorized, ComponentLink1Description=LCSC, ComponentLink1URL=https://www.lcsc.com/product-detail/WiFi-Modules_Espressif-Systems-ESP32-WROOM-32-N4_C82899.html, Item Type=Module, Manufacturer Part Number=ESP32-S3-WROOM-1U-N4, Pricing 1="1=3.25000 (USD)", RoHS=No, Stock 1=594, Supplier 1=Digi-Key
U2: "600mA 60dB Fixed 3.3V~3.3V Positive 7V SOT-89-3 Linear Voltage Regulators (LDO) ROHS", LCSC Part Number=C171498, Manufacturer="UTC(Unisonic Tech)", Package=SOT-89-3, ComponentLink1Description=LCSC, ComponentLink1URL=https://www.lcsc.com/product-detail/Linear-Voltage-Regulators-LDO_UTC-Unisonic-Tech-LR1107G-33-AB3-C-R_C171498.html, Item Type=IC, Manufacturer Part Number=LR1107G-33-AB3-C-R
U3: "IRM-H6 Series External Dimensions 5 x 7 x 4 mm SMT Infrared Receiver", LCSC Part Number=C91447, Manufacturer=Everlight, Max Operating Temperature=85°C, Min Operating Temperature=-25°C, Operating Supply Current=1.2mA, Operating Supply Voltage=5.5V, Package Quantity=2000, Supplier Part Number 1=5043152, Category="Optical Sensors", ComponentLink1Description=https://datasheet.ciiva.com/12418/irm-h638t-tr2-41100-12418542.pdf?src-supplier=Mouser, ComponentLink1URL=https://datasheet.ciiva.com/12418/irm-h638t-tr2-41100-12418542.pdf?src-supplier=Mouser, Item Type=IC, Lead Free="Lead Free", Manufacturer Part Number=IRM-H638T/TR2, Mount="Surface Mount", Number of Pins=4, Orientation="Top View", Packaging="Tape and Reel", Pricing 1="1000=0.53500, 2000=0.52000, 3000=0.51500, 4000=0.51000, 5000=0.49500 (USD)", RoHS=Yes, RoHS Compliant=Yes, Sensing Distance=8m, Supplier 1="Future Electronics"
U4: "RF Modules ROHS", LCSC Part Number=C2965513, Manufacturer="Chengdu Ebyte Elec Tech", Package=Custom, ComponentLink1Description=LCSC, ComponentLink1URL=https://www.lcsc.com/product-detail/RF-Modules_Chengdu-Ebyte-Elec-Tech-E07-400M10S_C2965513.html, Item Type=Module, Manufacturer Part Number=E07-400M10S

## Free pads (board coordinates)
  round 0.5 on Mech1: 1(0.777,0.767) 1(0.777,0.767) 1(14.527,49.017) 1(14.527,49.017) 1(64.027,-9.983) 1(64.027,-9.983)
  oval 1.7x1 on Mech1: 1(1.427,21.627) 1(1.427,21.627) 1(1.427,30.267) 1(5.227,21.627) 1(5.227,30.267)
  round 0.6 on Mech1: 1(1.527,26.017) 1(2.277,0.767) 1(2.577,33.617) 1(2.577,34.417) 1(2.577,35.217) 1(2.577,36.017) 1(3.277,18.517) 1(3.377,33.617) 1(3.377,34.417) 1(3.377,35.217) 1(3.377,36.017) 1(5.027,38.617) 1(5.027,39.367) 1(5.027,40.117) 1(5.027,40.867) 1(5.027,41.517) 1(5.777,0.767) 1(5.777,40.867) 1(5.777,41.517) 1(6.527,40.867) 1(6.527,41.517) 1(7.027,21.117) 1(7.027,21.817) 1(7.027,22.517) 1(7.027,23.217) 1(7.027,29.217) 1(7.027,29.917) 1(7.027,30.617) 1(7.277,40.867) 1(7.277,41.517) 1(7.727,21.117) 1(7.727,21.817) 1(7.727,22.517) 1(7.727,29.217) 1(7.727,29.917) 1(7.727,30.617) 1(7.777,13.267) 1(8.027,38.617) 1(8.027,39.367) 1(8.027,40.117) 1(8.027,40.867) 1(8.027,41.517) 1(9.027,29.767) 1(9.027,29.767) 1(9.277,0.767) 1(9.377,35.717) 1(9.377,36.417) 1(10.077,35.717) 1(10.077,36.417) 1(10.777,35.717) 1(10.777,36.417) 1(11.127,25.517) 1(11.127,26.517) 1(12.027,28.017) 1(12.027,28.767) 1(12.027,29.517) 1(12.477,33.217) 1(12.477,34.017) 1(12.477,34.817) 1(12.527,0.767) 1(12.777,9.517) 1(12.777,13.017) 1(12.777,28.017) 1(12.777,28.767) 1(12.777,29.517) 1(13.527,9.517) 1(13.527,13.017) 1(13.527,28.017) 1(13.527,28.767) 1(13.527,29.517) 1(13.827,22.717) 1(13.827,23.517) 1(13.827,24.317) 1(14.277,9.517) 1(14.277,13.017) 1(14.527,27.017) 1(14.527,30.267) 1(15.027,9.517) 1(15.027,13.017) 1(15.777,9.517) 1(15.777,13.017) 1(15.777,27.017) 1(15.777,30.267) 1(16.027,0.767) 1(17.027,27.017) 1(17.027,30.267) 1(17.277,5.767) 1(17.277,5.767) 1(17.527,1.767) 1(18.277,27.017) 1(18.277,30.267) 1(18.777,13.267) 1(18.777,14.017) 1(19.527,13.267) 1(19.527,14.017) 1(19.527,14.017) 1(20.277,13.267) 1(20.277,14.017) 1(20.777,46.767) 1(20.777,46.767) 1(21.027,13.267) 1(21.027,14.017) 1(21.277,2.017) 1(21.277,2.767) 1(21.777,13.267) 1(21.777,14.017) 1(22.027,2.017) 1(22.027,2.767) 1(22.527,37.517) 1(22.777,2.017) 1(22.777,2.767) 1(22.777,44.767) 1(23.527,2.017) 1(23.527,2.767) 1(25.777,10.767) 1(32.027,42.017) 1(32.027,44.517) 1(37.527,44.617) 1(37.527,45.317) 1(38.027,31.517) 1(38.027,36.017) 1(38.027,39.517) 1(38.227,44.617) 1(38.227,45.317) 1(38.527,0.517) 1(38.527,12.267) 1(38.777,36.017) 1(38.777,39.517) 1(39.127,49.317) 1(39.527,36.017) 1(39.527,39.517) 1(39.727,49.317) 1(39.777,7.517) 1(40.027,3.517) 1(40.277,36.017) 1(40.277,39.517) 1(40.327,49.317) 1(40.927,49.317) 1(41.027,36.017) 1(41.027,39.517) 1(41.527,41.477) 1(41.527,49.317) 1(42.277,0.517) 1(43.277,18.267) 1(43.777,-2.983) 1(44.17,0.717) 1(44.17,0.717) 1(44.17,3.767) 1(44.17,3.767) 1(44.17,6.767) 1(44.17,6.767) 1(44.927,48.217) 1(44.927,48.917) 1(45.227,42.717) 1(45.277,12.017) 1(45.92,2.267) 1(45.92,2.267) 1(45.92,5.267) 1(45.92,5.267) 1(45.92,8.267) 1(45.92,8.267) 1(45.927,33.217) 1(46.527,49.317) 1(46.77,-8.683) 1(46.77,-5.683) 1(46.777,28.767) 1(46.777,32.017) 1(46.777,32.017) 1(46.87,-4.883) 1(47.027,23.267) 1(47.07,-9.583) 1(47.57,-4.583) 1(47.67,11.017) 1(47.727,40.517) 1(47.87,-9.883) 1(48.37,-4.583) 1(48.67,11.017) 1(48.77,-9.883) 1(49.17,-4.783) 1(49.67,-9.783) 1(49.67,-5.383) 1(49.77,-8.883) 1(49.77,-7.983) 1(49.77,-7.083) 1(49.77,-6.183) 1(50.427,49.317) 1(50.527,37.717) 1(50.527,43.317) 1(53.227,40.517) 1(54.127,49.317) 1(54.527,19.767) 1(55.027,-2.483) 1(55.277,-10.233) 1(55.277,28.767) 1(55.527,7.767) 1(56.127,33.117) 1(56.277,20.267) 1(56.277,23.267) 1(56.277,23.267) 1(57.777,21.767) 1(57.777,21.767) 1(57.777,24.767) 1(57.777,24.767) 1(57.927,49.317) 1(58.827,32.317) 1(58.827,32.317) 1(58.927,24.017) 1(59.027,6.917) 1(59.027,33.767) 1(59.227,48.217) 1(59.227,48.917) 1(59.627,6.917) 1(59.67,0.017) 1(59.67,1.017) 1(59.67,2.017) 1(59.67,3.017) 1(59.92,-8.983) 1(59.92,-8.983) 1(59.92,-7.983) 1(59.92,-6.983) 1(59.92,-5.983) 1(59.92,-4.983) 1(60.227,6.917) 1(60.777,16.767) 1(60.827,30.217) 1(60.92,11.267) 1(61.42,-9.983) 1(61.42,-4.483) 1(61.92,11.267) 1(62.227,24.017) 1(62.277,48.267) 1(62.527,21.767) 1(62.627,37.117) 1(62.827,25.017) 1(63.327,4.217) 1(63.327,9.217) 1(63.527,44.017) 1(63.527,44.017) 1(63.777,-2.483) 1(64.277,42.767) 1(64.427,4.617) 1(64.427,5.517) 1(64.427,6.417) 1(64.427,7.317) 1(64.427,8.217)
  rect 1.4x1.6 on Mech1: 1(1.727,11.017) 1(1.727,18.517)
  rect 1.2x1.2 on Mech1: 1(3.327,12.667) 1(3.327,12.667) 1(3.327,12.667) 1(3.327,16.867) 1(3.327,16.867)
  rect 0x0.225 on Mech1: 1(4.802,34.317) 1(4.802,34.317) 1(6.352,34.317) 1(6.352,34.317) 1(6.352,34.317)
  rect 0.9x1.3 on Mech1: 1(5.027,36.167) 1(8.027,36.167) 1(8.027,36.167)
  rect 0x0 on Mech1: 1(5.407,23.197) 1(5.407,24.427) 1(5.407,25.447) 1(5.407,26.447) 1(5.407,27.467) 1(5.407,28.697) 1(6.027,13.257) 1(6.027,13.257) 1(6.027,14.277) 1(6.027,14.277) 1(6.027,14.277) 1(8.102,33.917) 1(8.102,33.917) 1(8.102,33.917) 1(9.017,25.517) 1(9.017,25.517) 1(9.017,25.517) 1(9.017,26.517) 1(9.017,26.517) 1(9.017,26.517) 1(9.577,23.517) 1(9.577,23.517) 1(9.577,23.517) 1(10.037,25.517) 1(10.037,25.517) 1(10.037,26.517) 1(10.037,26.517) 1(11.052,33.917) 1(11.052,33.917) 1(12.477,23.517) 1(12.477,23.517) 1(22.09,3.817) 1(22.09,3.817) 1(22.09,3.817) 1(22.09,5.717) 1(22.09,5.717) 1(22.09,5.717) 1(23.965,4.767) 1(23.965,4.767) 1(33.727,37.767) 1(33.727,37.767) 1(33.727,37.767) 1(39.327,37.767) 1(39.327,37.767) 1(39.777,45.002) 1(39.777,45.002) 1(39.777,47.952) 1(39.777,47.952) 1(39.777,47.952) 1(41.527,42.247) 1(41.527,42.247) 1(41.527,43.207) 1(41.527,43.207) 1(41.527,43.207) 1(41.527,47.247) 1(41.527,47.247) 1(41.527,48.207) 1(41.527,48.207) 1(41.527,48.207) 1(60.602,20.017) 1(60.602,21.017) 1(60.602,21.017) 1(60.602,21.017) 1(60.602,22.017) 1(60.602,22.017) 1(60.602,22.017) 1(60.602,23.017) 1(60.602,23.017) 1(60.602,23.017) 1(60.602,24.017) 1(60.602,24.017) 1(60.602,24.017) 1(60.602,25.017) 1(60.602,25.017) 1(60.602,25.017) 1(63.127,18.717) 1(63.127,18.717) 1(63.127,26.317) 1(63.527,47.229) 1(63.527,47.229) 1(63.527,48.804) 1(63.527,48.804) 1(63.527,48.804)
  rect 0x0.17 on Mech1: 1(6.027,15.287) 1(6.027,15.287) 1(6.027,15.287) 1(6.027,16.247) 1(6.027,16.247) 1(22.752,42.537) 1(22.752,42.537) 1(22.752,42.537) 1(22.752,43.497) 1(22.752,43.497) 1(63.277,5.287) 1(63.277,5.287) 1(63.277,5.287) 1(63.277,6.247) 1(63.277,6.247) 1(63.277,7.287) 1(63.277,7.287) 1(63.277,7.287) 1(63.277,8.247) 1(63.277,8.247)
  oct 0x0 on Mech1: 1(6.527,36.254)
  rect 0x0.219 on Mech1: 1(9.24,28.017) 1(9.24,28.017) 1(10.815,28.017) 1(10.815,28.017) 1(10.815,28.017)
  rect 0x1.5 on Mech1: 1(14.477,11.267) 1(14.477,11.267) 1(20.077,11.267) 1(20.077,11.267) 1(20.077,11.267)
  rect 0x0.135 on Mech1: 1(19.267,4.767) 1(19.267,4.767) 1(19.267,5.767) 1(19.267,5.767) 1(20.287,4.767) 1(20.287,4.767) 1(20.287,4.767) 1(20.287,5.767) 1(20.287,5.767) 1(20.287,5.767)
  rect 0x0.185 on Mech1: 1(22.752,40.507) 1(22.752,40.507) 1(22.752,40.507) 1(22.752,41.527) 1(22.752,41.527) 1(40.277,42.217) 1(40.277,42.217) 1(40.277,42.217) 1(40.277,43.237) 1(40.277,43.237) 1(63.527,45.007) 1(63.527,45.007) 1(63.527,45.007) 1(63.527,46.027) 1(63.527,46.027)
  round 1.8 on Mech1: 1(23.848,22.436) 1(23.848,22.436) 1(25.912,16.312) 1(25.912,16.312) 1(27.349,27.867) 1(27.349,27.867) 1(27.502,43.227) 1(27.502,43.227) 1(27.502,43.227) 1(27.502,45.767) 1(27.502,45.767) 1(31.986,14.108) 1(31.986,14.108) 1(32.542,21.517) 1(32.542,21.517) 1(33.777,28.517) 1(33.777,28.517) 1(37.497,17.483) 1(37.497,17.483) 1(38.294,23.895) 1(38.294,23.895)
  rect 0x1.8 on Mech1: 1(24.413,19.96) 1(25.765,25.882) 1(28.2,15.21) 1(34.274,15.21) 1(36.71,25.881) 1(38.062,19.959)
  rect 1.2x0.8 on Mech1: 1(24.502,41.997) 1(24.502,41.997) 1(24.502,44.537) 1(24.502,44.537) 1(24.502,44.537) 1(30.502,41.997) 1(30.502,41.997) 1(30.502,44.537) 1(30.502,44.537) 1(30.502,44.537)
  rect 0x0.65 on Mech1: 1(27.502,40.687)
  rect 0x1.075 on Mech1: 1(27.777,3.554) 1(27.777,3.554) 1(27.777,3.554) 1(27.777,6.479) 1(27.777,6.479) 1(31.027,3.554) 1(31.027,3.554) 1(31.027,3.554) 1(31.027,6.479) 1(31.027,6.479) 1(34.277,3.554) 1(34.277,3.554) 1(34.277,3.554) 1(34.277,6.479) 1(34.277,6.479) 1(37.527,3.554) 1(37.527,3.554) 1(37.527,3.554) 1(37.527,6.479) 1(37.527,6.479)
  rect 1.8x1.8 on Mech1: 1(30.002,21.517) 1(31.237,28.517)
  rect 1.5x0.9 on Mech1: 1(43.277,31.727) 1(43.277,32.997) 1(43.277,32.997) 1(43.277,32.997) 1(43.277,34.267) 1(43.277,34.267) 1(43.277,34.267) 1(43.277,35.537) 1(43.277,35.537) 1(43.277,35.537) 1(43.277,36.807) 1(43.277,36.807) 1(43.277,36.807) 1(43.277,38.077) 1(43.277,38.077) 1(43.277,38.077) 1(43.277,39.347) 1(43.277,39.347) 1(43.277,39.347) 1(43.277,40.617) 1(43.277,40.617) 1(43.277,40.617) 1(43.277,41.887) 1(43.277,41.887) 1(43.277,41.887) 1(43.277,43.157) 1(43.277,43.157) 1(43.277,43.157) 1(43.277,44.427) 1(43.277,44.427) 1(43.277,44.427) 1(43.277,45.697) 1(43.277,45.697) 1(43.277,45.697) 1(43.277,46.967) 1(43.277,46.967) 1(43.277,46.967) 1(43.277,48.237) 1(43.277,48.237) 1(43.277,48.237) 1(60.777,31.727) 1(60.777,31.727) 1(60.777,31.727) 1(60.777,32.997) 1(60.777,32.997) 1(60.777,32.997) 1(60.777,34.267) 1(60.777,34.267) 1(60.777,34.267) 1(60.777,35.537) 1(60.777,35.537) 1(60.777,35.537) 1(60.777,36.807) 1(60.777,36.807) 1(60.777,36.807) 1(60.777,38.077) 1(60.777,38.077) 1(60.777,38.077) 1(60.777,39.347) 1(60.777,39.347) 1(60.777,39.347) 1(60.777,40.617) 1(60.777,40.617) 1(60.777,40.617) 1(60.777,41.887) 1(60.777,41.887) 1(60.777,41.887) 1(60.777,43.157) 1(60.777,43.157) 1(60.777,43.157) 1(60.777,44.427) 1(60.777,44.427) 1(60.777,44.427) 1(60.777,45.697) 1(60.777,45.697) 1(60.777,45.697) 1(60.777,46.967) 1(60.777,46.967) 1(60.777,46.967) 1(60.777,48.237)
  rect 0.9x1.5 on Mech1: 1(45.042,30.477) 1(45.042,30.477) 1(45.042,30.477) 1(46.312,30.477) 1(46.312,30.477) 1(46.312,30.477) 1(47.582,30.477) 1(47.582,30.477) 1(47.582,30.477) 1(48.852,30.477) 1(48.852,30.477) 1(48.852,30.477) 1(50.122,30.477) 1(50.122,30.477) 1(50.122,30.477) 1(51.392,30.477) 1(51.392,30.477) 1(51.392,30.477) 1(52.662,30.477) 1(52.662,30.477) 1(52.662,30.477) 1(53.932,30.477) 1(53.932,30.477) 1(53.932,30.477) 1(55.202,30.477) 1(55.202,30.477) 1(55.202,30.477) 1(56.472,30.477) 1(56.472,30.477) 1(56.472,30.477) 1(57.742,30.477) 1(57.742,30.477) 1(57.742,30.477) 1(59.012,30.477)
  rect 0x0.66 on Mech1: 1(48.027,-8.483) 1(48.027,-8.483) 1(48.027,-7.213) 1(48.027,-7.213) 1(48.027,-7.213) 1(48.027,-5.943) 1(48.027,-5.943) 1(48.027,-5.943) 1(48.027,0.517) 1(48.027,0.517) 1(48.027,0.517) 1(48.027,1.787) 1(48.027,1.787) 1(48.027,1.787) 1(48.027,3.057) 1(48.027,3.057) 1(48.027,3.057) 1(48.027,4.327) 1(48.027,4.327) 1(48.027,4.327) 1(48.027,5.597) 1(48.027,5.597) 1(48.027,5.597) 1(48.027,6.867) 1(48.027,6.867) 1(48.027,6.867) 1(48.027,8.137) 1(48.027,8.137) 1(48.027,8.137) 1(48.027,9.407) 1(48.027,9.407) 1(48.027,9.407) 1(61.527,-8.483) 1(61.527,-8.483) 1(61.527,-7.213) 1(61.527,-7.213) 1(61.527,-5.943) 1(61.527,-5.943) 1(61.527,0.627) 1(61.527,0.627) 1(61.527,1.897) 1(61.527,1.897) 1(61.527,1.897) 1(61.527,3.167) 1(61.527,3.167) 1(61.527,3.167) 1(61.527,4.437) 1(61.527,4.437) 1(61.527,4.437) 1(61.527,5.707) 1(61.527,5.707) 1(61.527,5.707) 1(61.527,6.977) 1(61.527,6.977) 1(61.527,6.977) 1(61.527,8.247) 1(61.527,8.247) 1(61.527,8.247) 1(61.527,9.517) 1(61.527,9.517)
  rect 0.9x0.9 on Mech1: 1(49.127,39.117) 1(49.127,40.517) 1(49.127,41.917) 1(50.527,39.117) 1(50.527,40.517) 1(50.527,41.917) 1(51.927,39.117) 1(51.927,39.117) 1(51.927,40.517) 1(51.927,41.917)

## Via types
v1: diameter 0.6, hole 0.3, Top Layer to Bottom Layer, tented both sides, 138 vias
v2: diameter 0.6, hole 0.3, Top Layer to Bottom Layer, 1 vias

## Nets (pads, with @x,y where several pads share a name; then routed paths per layer and width w, separated by ;. In a path a pad name is that pad's centre, name@x,y a point inside that pad or via, vN(x,y) a via of type N, cw(c..) or ccw(c..) an arc to the next point about the centre after c; other vN are vias at no path point)
+3V3: C1.2 C2.2 C3.2 C10.2 C11.2 J2.1 P3.1 R3.2 R4.2 R6.2 U1.2 U2.3 U4.9 | length 138
  Top Layer w0.254: R4.2 v1(7.011,13.281)
  Top Layer w0.457: J2.1@60.595,24.864 v1(63.945,24.865)
  Top Layer w0.559: v1(17.653,40.005) 17.661,40.013 18.648,40.013 19.071,40.435 R6.2
  Bottom Layer w1.5: v1(7.011,13.281) 11.006,13.281 13.208,15.483 13.208,33.223 11.532,34.9 v1(11.532,36.728) ; 11.506,37.084 12.232,37.084 13.415,37.084 16.106,39.775 16.106,40.013 P3.1 ; v1(17.653,40.005) 17.645,40.013 16.13,40.013 P3.1 ; v1(59.842,6.502) 63.945,10.605 v1(63.945,24.865) 63.945,40.296 56.921,47.32 v1(45.085,47.32) 19.05,47.32 16.118,44.388 P3.1
  other v1: 12.232,36.728 11.532,37.428 12.232,37.428
+5V: C4.2 C8.1 C9.1 F1.2 LED2.1 LED4.1 LED6.1 LED8.1 P1.1 U2.2 | length 37
  Top Layer w1: 6.452,32.234 C4.2 ; C4.2@6.5,34.338 6.5,36.968 U2.2@6.5,39.232 ; F1.2 9.285,31.611
  Top Layer w1.016: C9.1@19.922,11.278 C9.1 ; C8.1 C8.1@33.808,37.659
  Top Layer w1.5: 13.026,31.914 13.026,28.376 v2(19.253,22.149) ; LED4.1 C8.1@33.808,37.659
  Bottom Layer w1.5: v2(19.253,22.149) 23.939,22.149 LED6.1
  other v1: 18.65,13.25 19.4,13.25 20.15,13.25 20.9,13.25 21.65,13.25 18.65,14 19.4,14 20.15,14 20.9,14 21.65,14 5,39.418 8,39.418 5,40.168 8,40.168 5,40.918 8,40.918 5,41.668 5.75,41.668 6.5,41.668 7.25,41.668 8,41.668 5,42.318 5.75,42.318 6.5,42.318 7.25,42.318 8,42.318
CC1: J1.A5 R2.2 | length 2.2
  Top Layer w0.381: J1.A5 6.957,26.462 9.114,26.462 R2.2
CC2: J1.B5 R1.2 | length 2.2
  Top Layer w0.381: J1.B5 6.955,25.454 9.115,25.454 R1.2
CS: P19.1 U1.22 U4.19 | length 38.9
  Top Layer w0.254: v1(45.542,-2.201) 45.542,-1.261 46.913,0.11 U4.19 50.885,0.11 53.967,3.193 U1.22
EN: C5.2 J2.6 P4.1 R3.1 U1.3 | length 49.4
  Top Layer w0.254: U1.3 43.329,46.076 v1(44.628,46.076) ; v1(58.319,18.591) 58.369,18.642 58.369,19.581 58.652,19.864 J2.6
  Bottom Layer w0.254: v1@41.021,43.205 41.021,45.169 41.89,46.038 44.59,46.038 v1(44.628,46.076) 54.28,46.076 56.642,43.713 56.642,20.268 v1(58.319,18.591)
  other v1: 41.021,43.256
GD00: P16.1 U1.18 U4.15 | length 34
  Top Layer w0.254: v1(45.542,7.338) 45.542,6.147 46.499,5.19 U4.15 50.403,5.19 51.842,6.63 51.842,24.685 48.887,27.64 U1.18
GD02: P14.1 U1.17 U4.14 | length 33.4
  Top Layer w0.254: v1(45.542,9.722) 46.338,8.927 46.338,7.291 47.169,6.46 50.173,6.46 51.343,7.63 51.343,24.574 47.617,28.299 U1.17
GND: C1.1 C2.1 C3.1 C4.1 C5.1 C6.1 C7.1 C8.2 C9.2 C10.1 C11.1 D1.1 J1.A12 J1.MH1 J1.MH2 J1.MH3 J1.MH4 J2.2 J2.MP1 J2.MP2 LED1.2 P10.1 Q1.2 R1.1 R2.1 R12.1 SW1.1 U1.1 U1.40 U1.41 U2.1 U3.1 U3.2 U4.1 U4.2 U4.3 U4.4 U4.5 U4.11 U4.12 U4.20 U4.22 | length 0.9
  Top Layer w0.254: C6.1 6.13,16.095 7.002,16.095 v1(7.01,16.104)
  other v1: 48.042,-9.4 48.943,-9.4 49.843,-9.3 47.243,-9.1 49.943,-8.4 46.942,-8.2 49.943,-7.5 49.943,-6.6 49.943,-5.7 46.942,-5.2 49.843,-4.9 47.042,-4.4 49.342,-4.3 47.743,-4.1 48.543,-4.1 59.442,-0.5 59.742,0 59.442,0.5 59.742,1 59.442,1.5 63.304,1.626 59.742,2 63.304,2.494 59.442,2.5 59.742,3 63.304,3.363 63.304,4.232 12.85,9.5 13.6,9.5 14.35,9.5 15.1,9.5 15.85,9.5 12.85,13 13.6,13 14.35,13 15.1,13 15.85,13 7.473,20.698 8.153,20.98 8.153,21.68 8.153,22.38 14.707,22.682 7.473,22.798 14.707,23.382 14.707,24.082 15.189,28.092 14.554,28.96 14.529,30.037 14.529,31.287 14.529,32.537 3.023,33.198 3.823,33.198 45.957,33.617 3.023,33.998 3.823,33.998 3.023,34.798 3.823,34.798 3.023,35.598 3.823,35.598 37.5,35.916 38.25,35.916 39,35.916 39.75,35.916 40.5,35.916 62.657,37.517 50.557,38.117 40.437,39.353 37.5,39.416 38.25,39.416 39,39.416 39.75,39.416 47.757,40.917 53.257,40.917 45.257,43.117 50.557,43.717 59.258,48.336 62.357,48.489 44.957,48.617
GPIO1: P9.1 R5.2 U1.39 | length 6.3
  Top Layer w0.254: U1.39 62.234,47.367 62.535,47.066 62.535,45.314 62.943,44.905 R5.2 63.589,44.893 63.589,43.421 v1(63.576,43.409)
GPIO8: P12.1 R11.2 U1.12 | length 54.3
  Top Layer w0.254: R11.2 v1(19.494,6.476) ; v1(41.834,34.646) 43.285,34.646 U1.12
  Bottom Layer w0.254: P12.1 18.632,5.613 v1(19.494,6.476) 40.359,6.476 41.834,7.95 v1(41.834,34.646)
GPIO11: P18.1 U1.19 U4.16 | length 34.1
  Top Layer w0.254: v1(45.542,4.953) 46.575,3.92 U4.16 50.632,3.92 52.343,5.63 52.343,24.795 50.157,26.98 U1.19
GPIO12: P15.1 U1.20 U4.17 | length 35
  Top Layer w0.254: v1(45.542,2.568) 48.118,2.568 U4.17 50.862,2.65 52.843,4.63 52.843,24.906 51.427,26.321 U1.20
GPIO13: P17.1 U1.21 U4.18 | length 37.2
  Top Layer w0.254: v1(45.542,0.184) 46.739,1.38 51.343,1.38 53.34,3.377 53.34,25.019 52.697,25.662 U1.21@52.697,31.208
GPIO18: P11.1 U1.11 U3.3 | length 28.6
  Top Layer w0.254: v1(23.444,44.425) v1(23.444,44.425) U3.3 U3.3 ; U1.11 43.311,35.941 v1(44.577,35.941)
  Bottom Layer w0.254: v1(23.444,44.425) 38.481,44.425 44.577,38.329 v1(44.577,35.941)
GPIO21: C6.2 P8.1 R4.1 SW1.2 U1.23 | length 86.8
  Top Layer w0.254: SW1.2 4.474,16.558 4.623,16.409 4.623,15.443 4.919,15.147 v1(5.309,15.147) C6.2 ; v1(55.238,29.261) U1.23
  Bottom Layer w0.254: v1(5.309,15.147) 5.309,10.033 13.233,2.108 P8.1 38.71,2.108 43.815,7.214 43.815,26.645 46.431,29.261 v1(55.238,29.261)